# Altium PCB reference.PcbDoc
Units mm, origin at the board's own origin, x right, y up, seen from the top; angles counter-clockwise.
Board outline 63.5 x 45.72 mm, 2 copper layers (Top Layer, Bottom Layer), stack 1.6 mm thick; 4 components, 5 nets, 10 pads, 0 vias.
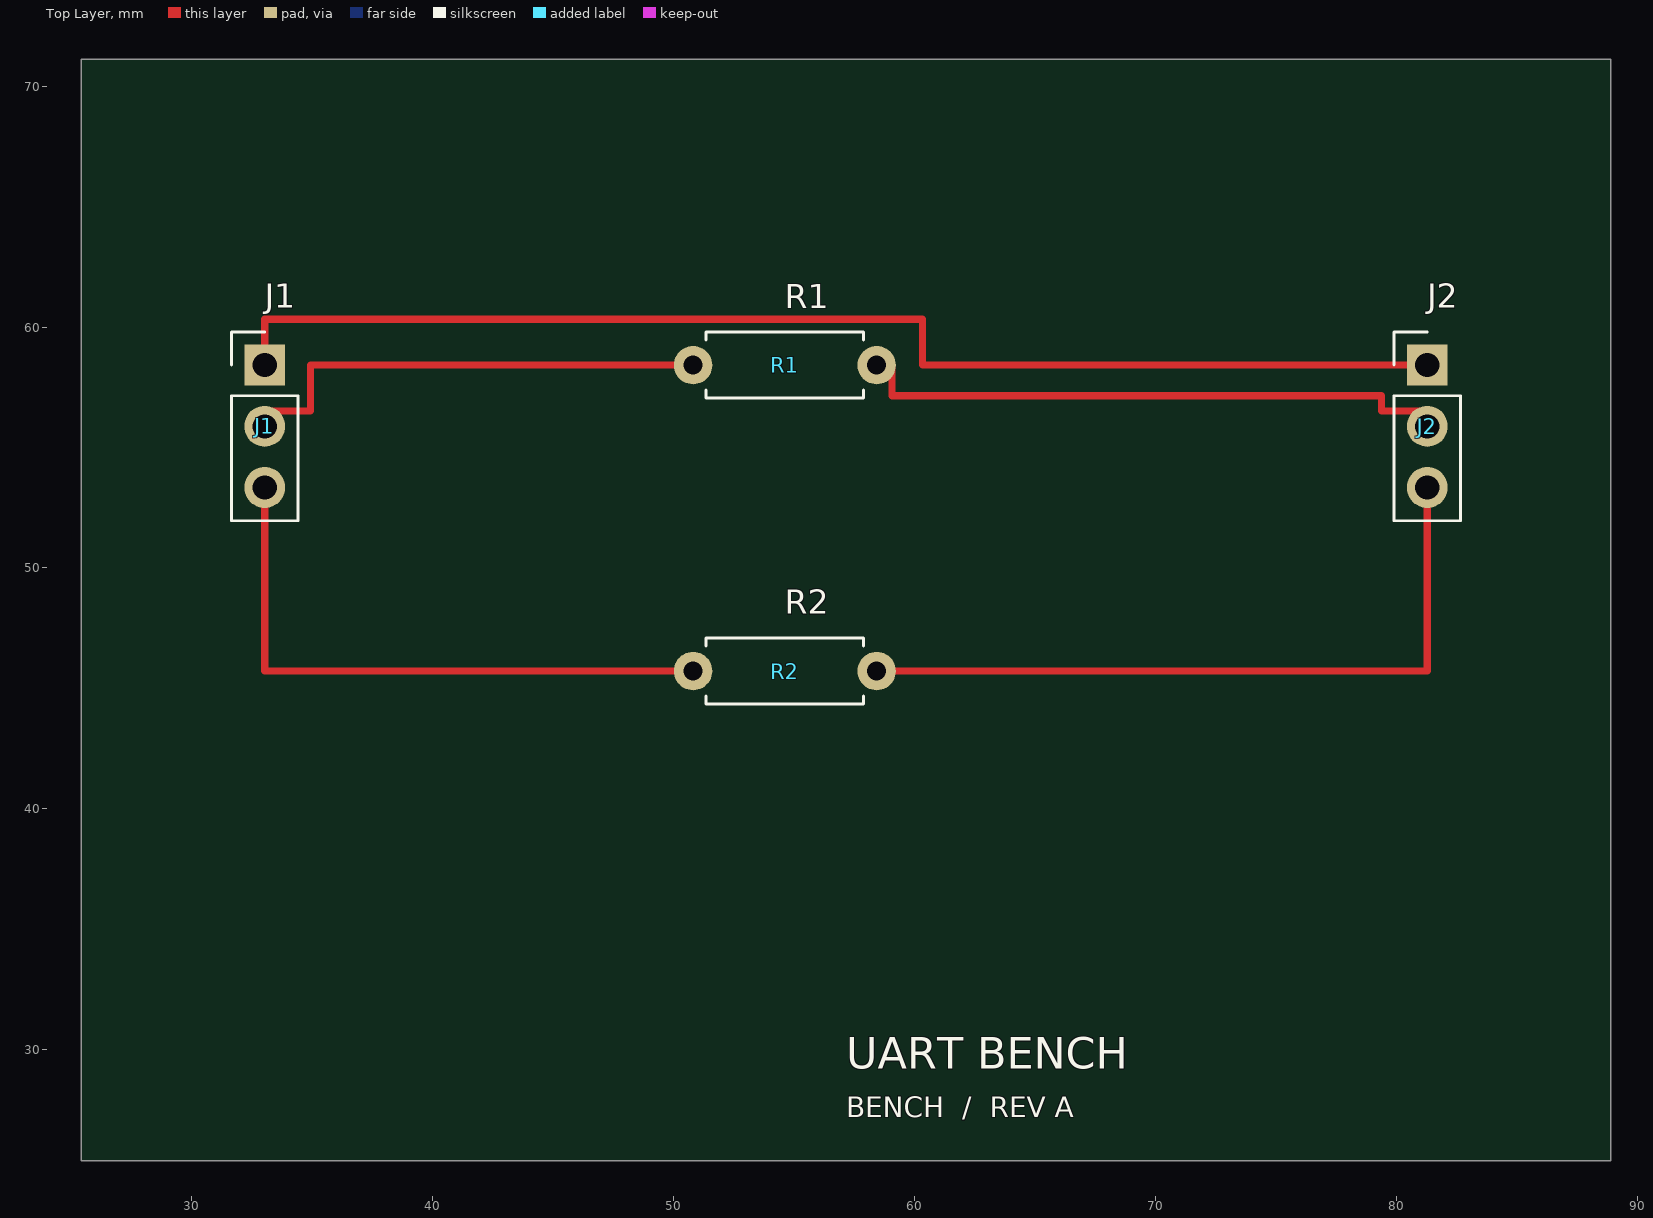
[diagram p0: Top Layer view]
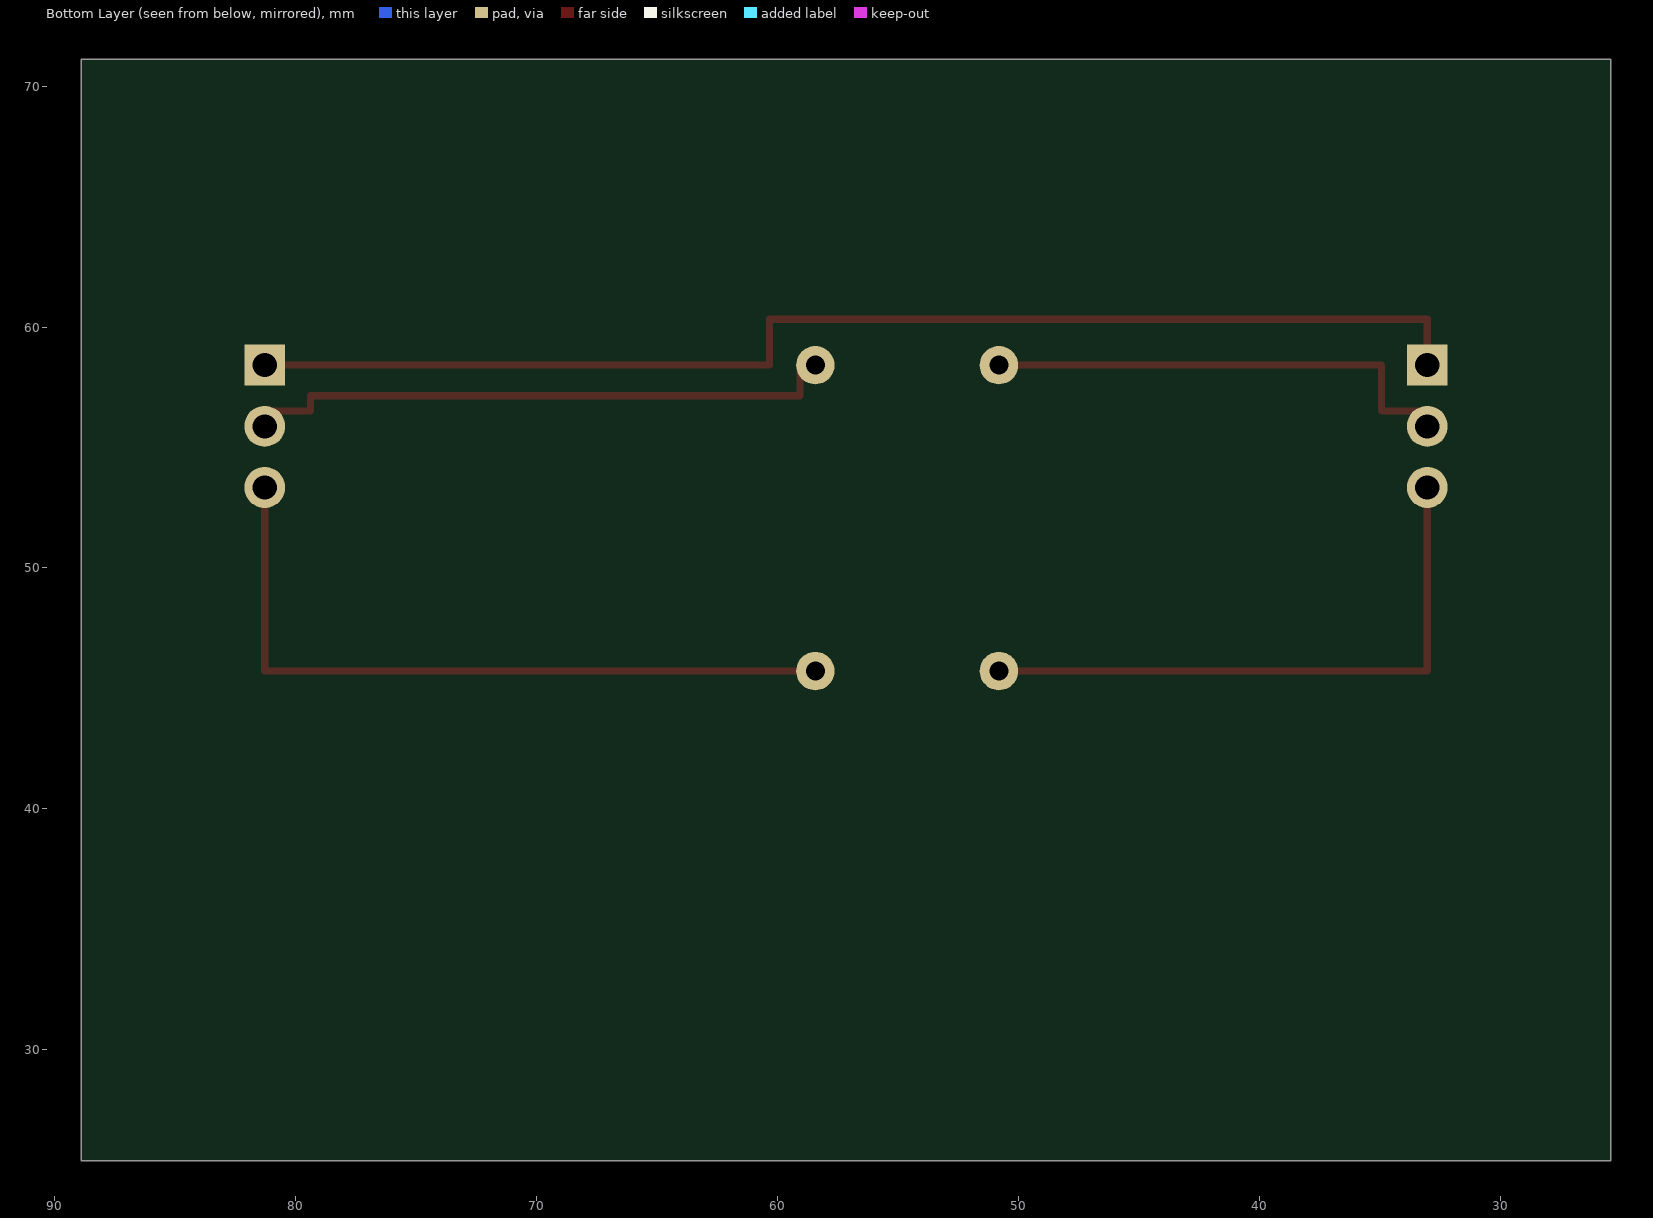
[diagram p1: Bottom Layer view, seen from below]

## Layer stack, top to bottom
Top Layer: signal copper 0.035
Dielectric: dielectric 1.53, FR-4, Dk 4.2
Bottom Layer: signal copper 0.035

## Board outline
25.4,71.12 88.9,71.12 88.9,25.4 25.4,25.4

## Design rules (kind name [scope] priority, off if disabled: settings)
Clearance [All] p1: gap=0.2 ignorepadtopadclearanceinfootprint=FALSE
Width "Signal width" [All] p1: maxlimit=0.5 minlimit=0.25 preferedwidth=0.3

## Components (designator, comment, footprint, x,y, rotation, side; value= is the part's Value field where it differs from the comment)
J1 "" J1 33.02,58.42 r0 top
J2 "" J2 81.28,58.42 r0 top
R1 "" R1 50.8,58.42 r0 top
R2 "" R2 50.8,45.72 r0 top

## Footprints (in the part's own frame and the unit in brackets; to place one, negate y for a bottom-side part, rotate by r counter-clockwise, add the part's x,y. Pads: shape width x height; smd on the part's side, far side on the other; paste and mask are expansions set on the pad)
J1 [mm]
  rect 1.7x1.7 hole 1: 1(0,0)
  round 1.7 hole 1: 2(0,-2.54) 3(0,-5.08)
  silkscreen extent -1.38,-6.46 1.38,1.38
J2 [mm]
  rect 1.7x1.7 hole 1: 1(0,0)
  round 1.7 hole 1: 2(0,-2.54) 3(0,-5.08)
  silkscreen extent -1.38,-6.46 1.38,1.38
R1 [mm]
  round 1.6 hole 0.8: 1(0,0) 2(7.62,0)
  silkscreen extent 0.54,-1.37 7.08,1.37
R2 [mm]
  round 1.6 hole 0.8: 1(0,0) 2(7.62,0)
  silkscreen extent 0.54,-1.37 7.08,1.37

## Part data
J1 J2: library part Header_3
R1 R2: library part Resistor

## Nets (pads, with @x,y where several pads share a name; then routed paths per layer and width w, separated by ;. In a path a pad name is that pad's centre, name@x,y a point inside that pad or via, vN(x,y) a via of type N, cw(c..) or ccw(c..) an arc to the next point about the centre after c; other vN are vias at no path point)
GND: J1.1 J2.1 | length 52.1
  Top Layer w0.3: J1.1 33.02,60.325 60.325,60.325 60.325,58.42 J2.1
MON_TX1: J2.2 R1.2 | length 25.4
  Top Layer w0.3: R1.2 59.055,58.42 59.055,57.15 79.375,57.15 79.375,56.515 81.28,56.515 J2.2
MON_TX3: J2.3 R2.2 | length 30.5
  Top Layer w0.3: R2.2 81.28,45.72 J2.3
PA9_TX1: J1.2 R1.1 | length 20.3
  Top Layer w0.3: J1.2 33.02,56.515 34.925,56.515 34.925,58.42 R1.1
PD8_TX3: J1.3 R2.1 | length 25.4
  Top Layer w0.3: J1.3 33.02,45.72 R2.1

## Silkscreen, mask and mechanical layers (free items; w line width, h text height)
Top Overlay:
  text "J1" at 33.02,60.8 h1
  text "J2" at 81.28,60.8 h1
  text "R1" at 54.61,60.79 h1
  text "R2" at 54.61,48.09 h1
  text "UART BENCH" at 57.15,29.2 h1.3
  text "BENCH  /  REV A" at 57.15,27.2 h0.85